# Altium PCB OLED_PCB.PcbDoc
Units mil, origin at the board's own origin, x right, y up, seen from the top; angles counter-clockwise.
Board outline 570.87 x 457.48 mil, 2 copper layers (Top Layer, Bottom Layer), stack 57 mil thick; 8 components, 8 nets, 38 pads, 12 vias.
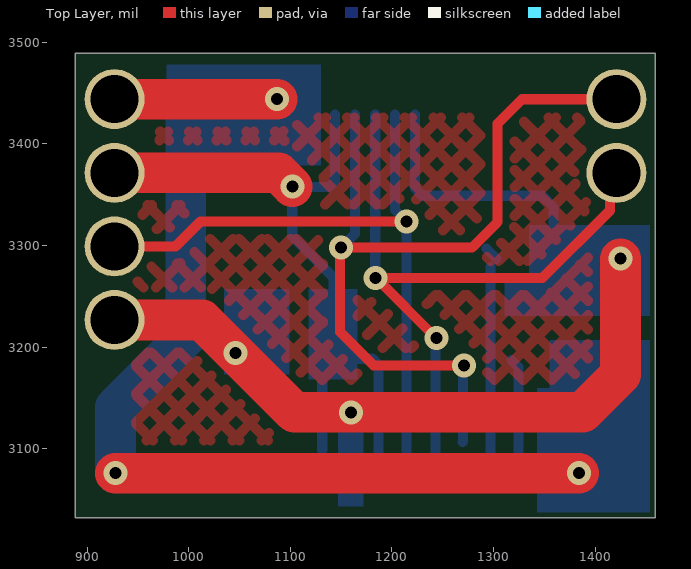
[diagram p0: Top Layer view]
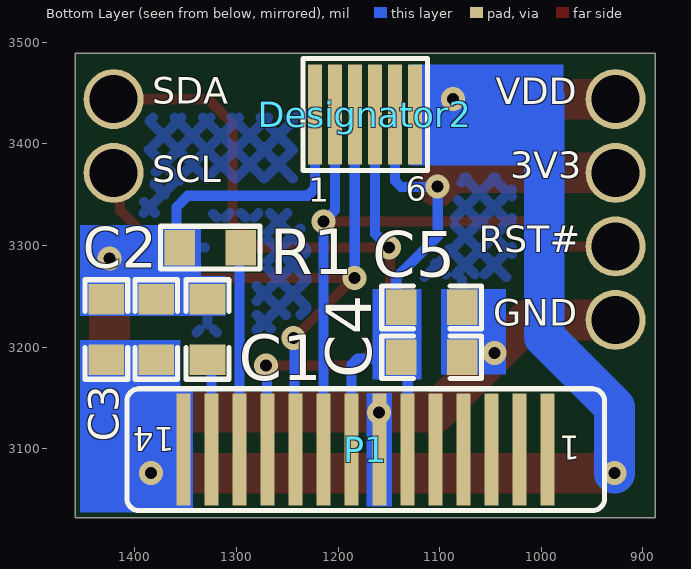
[diagram p1: Bottom Layer view, seen from below]
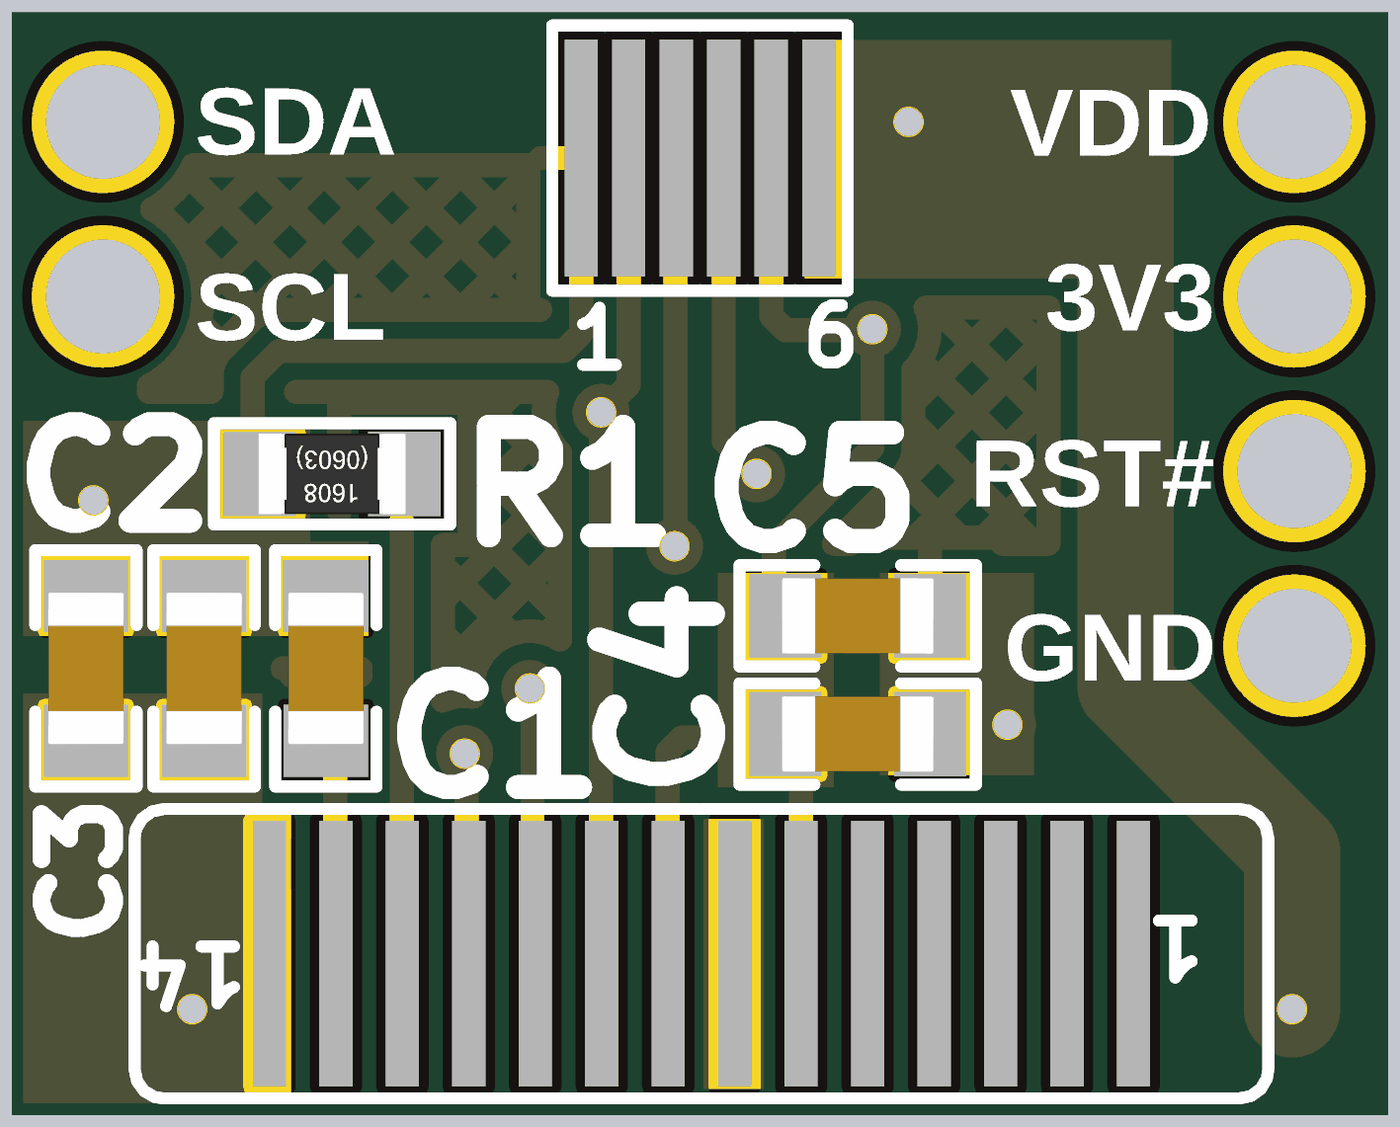
[diagram p2: 3D render of the assembled board from below, using the file's embedded part models]

## Layer stack, top to bottom
Top Solder: solder mask 3, Solder Resist, Dk 3.5
Top Layer: signal copper 10
Dielectric 1: dielectric 37, FR-4, Dk 4.8
Bottom Layer: signal copper 10
Bottom Solder: solder mask 3, Solder Resist, Dk 3.5

## Board outline
888.13,3032 888.13,3489.48 1459,3489.48 1459,3032

## Design rules (kind name [scope] priority, off if disabled: settings)
Clearance [All] p1: gap=7 ignorepadtopadclearanceinfootprint=FALSE except(0: Arc-Hole Track-Hole SMDPad-Hole THPad-Hole Via-Hole Fill-Hole Poly-Hole Region-Hole Text-Hole; 4: Arc-SMDPad Track-SMDPad SMDPad-SMDPad)
HoleSize [All] p1: absolutevalues=TRUE maxlimit=1000 minlimit=1 maxpercent=80.000 minpercent=20.000
HoleToHoleClearance [All] p1: gap=0 allowstackedmicrovias=TRUE
MinimumSolderMaskSliver [All] p1: minsoldermaskwidth=0
PolygonConnect [All] p1: connectstyle=Relief reliefconductorwidth=10 reliefentries=4 polygonreliefangle="90 Angle" airgapwidth=10
RoutingVias [All] p1: holewidth=11.81 width=23.62 viastyle="Through Hole" minholewidth=11.81 minwidth=23.62 maxholewidth=11.81 maxwidth=23.62
SilkToSilkClearance [All] p1: silktosilkclearance=0
SilkToSolderMaskClearance [IsPad] p1: minsilkscreentomaskgap=0 clearancetoexposedcopper=TRUE
SolderMaskExpansion [All] p1: expansion=4 istentingtop=FALSE
Width [All] p1: maxlimit=40 minlimit=10 preferedwidth=22
25 further rules are at their usual default settings.

## Classes and differential pairs
component class OLED_Section: C1 C2 C3 C4 C5 P1 R1

## Components (designator, comment, footprint, x,y, rotation, side; value= is the part's Value field where it differs from the comment)
C1 "2.2uF" Cap0603 1328.58,3217.35 r90 bottom
C2 "4.7UF" Cap0603 1379.06,3217.35 r90 bottom
C3 "0.1uF" Cap0603 1428.06,3217.35 r90 bottom
C4 "4.7UF" Cap0603 1108.06,3190.13 r180 bottom
C5 "0.1uF" Cap0603 1108.06,3239.13 r180 bottom
Designator2 "Comment" "6 Pin SMD PAD" 1222.68,3429 r180 bottom
P1 "GDO0049W" GDO0049W 1172.87,3099 r0 bottom
R1 "560K" Res0603 1326,3298 r180 bottom

## Footprints (in the part's own frame and the unit in brackets; to place one, negate y for a bottom-side part, rotate by r counter-clockwise, add the part's x,y. Pads: shape width x height; smd on the part's side, far side on the other; paste and mask are expansions set on the pad)
"6 Pin SMD PAD" [mm]
  rect 0.35x2.5 smd: 1(0,0) 2(0.5,0) 3(1,0) 4(1.5,0) 5(2,0) 6(2.5,0)
  silkscreen extent -0.3,-1.4 2.8,1.4
Cap0603 [mil]
  rect 30x35 smd mask+2.36: 1(-30,0) 2(30,0)
  silkscreen extent -49,-21 49,21, body extent -32,-16 31,16, height 34
GDO0049W [mm]
  rect 0.35x2.8 smd: 1(-4.55,0) 2(-3.85,0) 3(-3.15,0) 4(-2.45,0) 5(-1.75,0) 6(-1.05,0) 7(-0.35,0) 8(0.35,0) 9(1.05,0) 10(1.75,0) 11(2.45,0) 12(3.15,0) 13(3.85,0) 14(4.55,0)
  silkscreen extent -5.97,-1.52 5.97,1.52
Res0603 [mil]
  rect 30x35 smd: 1(-30,0) 2(30,0)
  silkscreen extent -49,-21 49,21, body extent -31,-17 31,17, height 18

## Part data
C1: library part CC0603KRX5R8BB225, "CAP CER 2.2UF 25V X5R 0603", Case Code (Imperial)=0603, Case Code (Metric)=1608, Dielectric=X5R, Manufacturer=Yageo, Max Operating Temperature=85°C, Min Operating Temperature=-55°C, Package Quantity=4000, Resistor Type=Ceramic, Supplier Part Number 1=311-1786-1-ND, Tolerance=10%, Voltage Rating=25V, Capacitance=2.2uF, Case/Package=0603, ComponentLink1Description=https://www.verical.com/server-webapp/html/getDatasheet?partID=782757&src-supplier=Verical, ComponentLink1URL=https://www.verical.com/server-webapp/html/getDatasheet?partID=782757&src-supplier=Verical, Depth=0.8mm, Halogen Free="Halogen Free", Lead Free="Lead Free", Length=1.6mm, Manufacturer Part Number=CC0603KRX5R8BB225, Mount="Surface Mount", Packaging="Tape and Reel", Pricing 1="1=0.4, 10=0.276, 50=0.1932, 100=0.1656, 500=0.1242, 1000=0.10488 (USD)", Radiation Hardening=No, RoHS Compliant=Yes, Stock 1=687936, Supplier 1=Digi-Key, Termination=SMD/SMT, Thickness=0.037inch, Voltage Rating (DC)=25V, Weight=7.1E-05oz, Width=0.031inch
C2 C4: library part CL10A475KA8NQNC, "CAP CER 4.7UF 25V X5R 0603", Capacitance=4.7uF, Case Code (Imperial)=0603, Case Code (Metric)=1608, Dielectric=X5R, Manufacturer=Samsung, Max Operating Temperature=85°C, Min Operating Temperature=-55°C, Package Quantity=1, Supplier Part Number 1=1276-1900-1-ND, Tolerance=10%, Voltage Rating=25V, Case/Package=0603, ComponentLink1Description=http://www.samsungsem.com/kr/support/product-search/mlcc/CL10A475KA8NQNC.jsp?src-supplier=Digi-Key, ComponentLink1URL=http://www.samsungsem.com/kr/support/product-search/mlcc/CL10A475KA8NQNC.jsp?src-supplier=Digi-Key, Contact Plating=Tin, Depth=0.8mm, Lead Free="Lead Free", Length=1.6mm, Manufacturer Part Number=CL10A475KA8NQNC, Mount="Surface Mount", Packaging="Tape and Reel", Pricing 1="1=0.37, 10=0.255, 100=0.1528, 500=0.11456, 1000=0.09675 (USD)", Stock 1=2252340, Supplier 1=Digi-Key, Termination=Wraparound, Thickness=0.035inch, Width=0.031inch
C3 C5: library part CC0603ZRY5V9BB104, "CAP CER 0.1UF 50V Y5V 0603", Capacitance=100nF, Case Code (Imperial)=0603, Case Code (Metric)=1608, Dielectric=Y5V, Manufacturer=Yageo, Max Operating Temperature=85°C, Min Operating Temperature=-30°C, Package Quantity=1, Supplier Part Number 1=311-1343-1-ND, Tolerance=80%, Voltage=50V, Case/Package=0603, ComponentLink1Description=http://www.yageo.com/documents/recent/UPY-GPHC_Y5V_6.3V-to-50V_8.pdf?src-supplier=Digi-Key, ComponentLink1URL=http://www.yageo.com/documents/recent/UPY-GPHC_Y5V_6.3V-to-50V_8.pdf?src-supplier=Digi-Key, ComponentLink2Description=http://www.yageo.com/documents/recent/UPY-GPHC_Y5V_6.3V-to-50V_5.pdf?src-supplier=Avnet+Europe, ComponentLink2URL=http://www.yageo.com/documents/recent/UPY-GPHC_Y5V_6.3V-to-50V_5.pdf?src-supplier=Avnet+Europe, ComponentLink3Description=https://www.verical.com/server-webapp/html/getDatasheet?partID=403611&src-supplier=Verical, ComponentLink3URL=https://www.verical.com/server-webapp/html/getDatasheet?partID=403611&src-supplier=Verical, ComponentLink4Description=http://www.mouser.com/ds/2/447/Yageo_UPY-GP_NP0_16V-to-50V_9-358835.pdf?src-supplier=Mouser, ComponentLink4URL=http://www.mouser.com/ds/2/447/Yageo_UPY-GP_NP0_16V-to-50V_9-358835.pdf?src-supplier=Mouser, ComponentLink5Description=http://www.farnell.com/datasheets/1132289.pdf?src-supplier=Element14, ComponentLink5URL=http://www.farnell.com/datasheets/1132289.pdf?src-supplier=Element14, Composition=Ceramic, Depth=0.8mm, Halogen Free="Halogen Free", Height=0.8mm, Lead Free="Lead Free", Length=1.6mm, Manufacturer Part Number=CC0603ZRY5V9BB104, Mount="Surface Mount", Number of Pins=2, Packaging="Tape and Reel", Pricing 1="1=0.1, 10=0.075, 100=0.0334, 500=0.02386, 1000=0.01874 (USD)", Radiation Hardening=No, REACH SVHC="No SVHC", Stock 1=15000880, Supplier 1=Digi-Key, Termination=SMD/SMT, Thickness=0.035inch, Voltage Rating=50V, Voltage Rating (DC)=50V, Width=0.031inch
P1: "Monochrome/ 64x32 Resolution/ IIC Interface/ SSD1306/ FPC Soldering OLED", Manufacturer="Good Display", ComponentLink1Description="Good Display", ComponentLink1URL=https://www.good-display.com/product/294.html, Manufacturer Part Number=GDO0049W
R1: library part AECR0603F560KK9, "±1% 100mW Thick Film Resistors 50V ±100ppm/℃ -55℃~+125℃ 560kΩ 0603 Chip Resistor - Surface Mount ROHS", Manufacturer=Resistor.Today, Package=0603, Manufacturer Part No=AECR0603F560KK9

## Free pads (board coordinates)
  round 59.06 hole 47.24: 1(927,3444) 2(927,3371.58) 3(1421,3444) 4(1421,3371.58) 5(927,3299.16) 6(927,3226.74)

## Via types
v1: diameter 23.62, hole 11.81, Top Layer to Bottom Layer, tented both sides, 12 vias

## Nets (pads, with @x,y where several pads share a name; then routed paths per layer and width w, separated by ;. In a path a pad name is that pad's centre, name@x,y a point inside that pad or via, vN(x,y) a via of type N, cw(c..) or ccw(c..) an arc to the next point about the centre after c; other vN are vias at no path point)
GND: C1.2 C2.2 C3.2 C4.2 C5.2 Designator2.1 P1.7 pad.6 R1.1 | length 1030.7
  Top Layer w40: pad.6 1013.26,3226.74 1104.2,3135.8 1387.8,3135.8 1425,3173 v1(1425,3287)
  Bottom Layer w10: P1.7@1159.73,3081.37 v1(1159.73,3135.8) ; Designator2.1 1222.68,3356.32 1230,3349 1348,3349 1359,3338 1359,3301 R1.1
  Bottom Layer w22: C4.2@1069.5,3190.69 1070.06,3190.13 C5.2@1070.06,3225.13 ; C5.2@1070.06,3239.13 1077.96,3239.13 C5.2@1084.83,3246
  other v1: 1046,3194
IREF: P1.12 R1.2 | length 211.8
  Bottom Layer w10: R1.2@1293,3297 R1.2@1303,3287 ; P1.12@1297.15,3081 1297.15,3278.64
OLED_RST#: Designator2.2 P1.9 pad.5 | length 650.3
  Top Layer w10: pad.5 987.16,3299.16 1011.53,3323.53 v1(1214.47,3323.53)
  Bottom Layer w10: Designator2.2 1203,3335 v1(1214.47,3323.53) P1.9@1214.47,3081
SCL: Designator2.3 P1.10 pad.4 | length 671.9
  Top Layer w10: v1(1184,3268) v1@1184.5,3268 ; v1(1244,3209) 1243.5,3209 v1@1184.5,3268 ; pad.4 1414.8,3365.38 1414.8,3334.8 1348,3268 v1@1184.5,3268
  Bottom Layer w10: Designator2.3 1183.66,3428.66 1183.66,3268.34 v1(1184,3268) ; P1.10@1242.03,3081 1242.88,3081.85 1242.88,3207.88 v1(1244,3209)
SDA: Designator2.4 P1.11 pad.3 | length 820.1
  Top Layer w10: v1(1271,3182) 1182,3182 1149,3215 1149,3297 v1(1150,3298) 1279,3298 1304,3323 1304,3420 1328,3444 pad.3
  Bottom Layer w10: v1(1150,3298) 1163.63,3311.63 Designator2.4 ; P1.11@1269.66,3106.5 1270.16,3107 1270.16,3181.16 v1(1271,3182)
VCC_3V3: C4.1 C5.1 Designator2.5 P1.6 P1.8 pad.2 | length 785.4
  Top Layer w40: pad.2 1088.42,3371.58 v1(1102,3358)
  Bottom Layer w10: C5.1@1126,3228.5 1142,3212.5 1158.06,3228.56 1158.06,3240.94 1147,3252 1142.86,3252 1142.86,3268.14 1102,3309 v1(1102,3358) 1102.39,3357.61 1138.09,3357.61 1143.94,3363.46 Designator2.5 ; P1.6 1131.53,3182.04 1138.06,3188.58 1181.06,3188.58 1186.91,3182.72 P1.8@1186.91,3081 ; C4.1 1138.06,3212.5 C5.1
VCOMH: C1.1 P1.13 | length 109.3
  Bottom Layer w10: C1.1@1317.58,3187.35 1324.71,3180.23 P1.13@1324.71,3081
VDD: C2.1 C3.1 Designator2.6 P1.14 pad.1 | length 1113.6
  Top Layer w40: pad.1 v1(1087,3444) ; v1(928,3076) v1(1384,3076)
  Bottom Layer w10: v1(1087,3444) 1088.37,3444 1102.37,3430 1122.37,3430 1123.37,3429 Designator2.6
  Bottom Layer w40: v1(928,3076) 928,3141 997,3210 997,3447 ; v1(1384,3076) 1404.5,3096.5 1404.5,3122.02
pads on no net: P1.1 P1.2 P1.3 P1.4 P1.5

## Polygon pours and split planes (outlines as drawn)
GND on Bottom Layer "Polygom_2" (hatched 45Degree grid 20 track 10, remove dead copper, pour order 1): 947,3084 1402,3084 1402,3426 947,3426
no net on Top Layer "Polygom_2" (hatched 45Degree grid 20 track 10, remove dead copper, pour order 2): 948,3090 1402,3090 1402,3426 948,3426

## Other copper
Bottom Layer:
  region net GND: 1099,3173 1099,3257 1035,3257 1035,3173
  rectangle net VDD: 978,3379 1130,3478
  rectangle net VCC_3V3: 1118,3168 1166,3257
  region net GND: 1454,3230.66 1454,3320 1335,3320 1335,3230.66
  region net GND: 1172,3043 1172,3155 1147,3155 1147,3043
  region net VDD: 1375,3037 1375,3160 1343,3160 1343,3037
  region net GND: 1353.02,3230.66 1353.02,3270.03 1311,3270.03 1311,3230.66
  region net VDD: 1454,3037 1454,3207.04 1355,3207.04 1355,3037

## Silkscreen, mask and mechanical layers (free items; w line width, h text height)
Bottom Overlay:
  text "SDA" at 1383,3430.53 h45
  text "VDD" at 1045,3430 h45
  text "3V3" at 1030.47,3357.53 h45
  text "SCL" at 1383,3353.53 h45
  text "RST#" at 1061.51,3284.53 h45
  text "GND" at 1047.5,3212.27 h45
Mechanical 2:
  the board outline again, w10
Fabrication:
  drawing of 331 lines, arcs and shapes, not listed
  text "Layer" at 1653.5,7457.81 h60
  text "Name" at 2063.42,7457.81 h60
  text "Material" at 2993.16,7457.81 h60
  text "Thickness" at 3852.93,7457.81 h60
  text "Constant" at 4502.76,7457.81 h60
  text "Board Layer Stack" at 5072.62,7457.81 h60
  text "Top Overlay" at 2063.42,7337.81 h60
  text "Top Solder" at 2063.42,7217.81 h60
  text "Solder Resist" at 2993.16,7217.81 h60
  text "3.00mil" at 3852.93,7217.81 h60
  text "3.5" at 4502.76,7217.81 h60
  text "1" at 1653.5,7097.81 h60
  text "Top Layer" at 2063.42,7097.81 h60
  text "10.00mil" at 3852.93,7097.81 h60
  text "Dielectric 1" at 2063.42,6977.81 h60
  text "FR-4" at 2993.16,6977.81 h60
  text "37.00mil" at 3852.93,6977.81 h60
  text "4.8" at 4502.76,6977.81 h60
  text "2" at 1653.5,6857.81 h60
  text "Bottom Layer" at 2063.42,6857.81 h60
  text "10.00mil" at 3852.93,6857.81 h60
  text "Bottom Solder" at 2063.42,6737.81 h60
  text "Solder Resist" at 2993.16,6737.81 h60
  text "3.00mil" at 3852.93,6737.81 h60
  text "3.5" at 4502.76,6737.81 h60
  text "Bottom Overlay" at 2063.42,6617.81 h60
Drill Drawing:
  circle w10: c976.62,2610.83 r33.33
  lines w10: 943.29,2427.5 1009.96,2427.5 1009.96,2494.17 943.29,2494.17 943.29,2427.5
  lines w15: 883.5,2382.5 11444.57,2382.5 ; 883.5,2682.5 11444.57,2682.5 ; 1434.38,2232.5 1434.38,2832.5 ; 1964.24,2232.5 1964.24,2832.5 ; 3053.92,2232.5 3053.92,2832.5 ; 3559.8,2232.5 3559.8,2832.5 ; 4293.6,2232.5 4293.6,2832.5 ; 5793.15,2232.5 5793.15,2832.5 ; 6383,2232.5 6383,2832.5 ; 7128.8,2232.5 7128.8,2832.5 ; 7878.59,2232.5 7878.59,2832.5 ; 8732.35,2232.5 8732.35,2832.5 ; 10065.96,2232.5 10065.96,2832.5 ; 883.5,2232.5 11444.57,2232.5 11444.57,2832.5 883.5,2832.5 883.5,2232.5
  text "Symbol" at 973.5,2727.5 h72
  text "Count" at 1479.38,2727.5 h72
  text "Hole Size" at 2009.24,2727.5 h72
  text "Plated" at 3098.92,2727.5 h72
  text "Hole Type" at 3604.8,2727.5 h72
  text "Drill Layer Pair" at 4338.6,2727.5 h72
  text "Via/Pad" at 5838.15,2727.5 h72
  text "Pad Shape" at 6428,2727.5 h72
  text "Template" at 7173.8,2727.5 h72
  text "Description" at 7923.59,2727.5 h72
  text "Hole Tolerance (+)" at 8777.35,2727.5 h72
  text "Hole Tolerance (-)" at 10110.96,2727.5 h72
  text "6" at 1479.38,2577.5 h60
  text "47.24mil (1.200mm)" at 2009.24,2577.5 h60
  text "PTH" at 3098.92,2577.5 h60
  text "Round" at 3604.8,2577.5 h60
  text "Top Layer - Bottom Layer" at 4338.6,2577.5 h60
  text "Pad" at 5838.15,2577.5 h60
  text "Rounded" at 6428,2577.5 h60
  text "c150h120" at 7173.8,2577.5 h60
  text "12" at 1479.38,2427.5 h60
  text "11.81mil (0.300mm)" at 2009.24,2427.5 h60
  text "PTH" at 3098.92,2427.5 h60
  text "Round" at 3604.8,2427.5 h60
  text "Top Layer - Bottom Layer" at 4338.6,2427.5 h60
  text "Via" at 5838.15,2427.5 h60
  text "Rounded" at 6428,2427.5 h60
  text "v60h30m0mx0" at 7173.8,2427.5 h60
  text "18 Total" at 1479.38,2277.5 h60

## Dimensions
888.13,3489.48 to 888.13,3032 on Mechanical 1
888.13,3489.48 to 1459,3489.48 on Mechanical 1

## Text inside footprints (layer, text, board x,y; h text height)
Designator2: Bottom Overlay "6" at 1133.68,3344 h23.62; Bottom Overlay "1" at 1229.68,3343 h23.62
P1: Bottom Overlay "1" at 961.87,3113 h23.62 r180; Bottom Overlay "14" at 1360.87,3121 h23.62 r180